# Altium PCB PCB1.PcbDoc
Units mil, origin at the board's own origin, x right, y up, seen from the top; angles counter-clockwise.
Board outline 2780 x 3330 mil, 2 copper layers (Top Layer, Bottom Layer); 17 components, 28 nets, 145 pads, 32 vias.
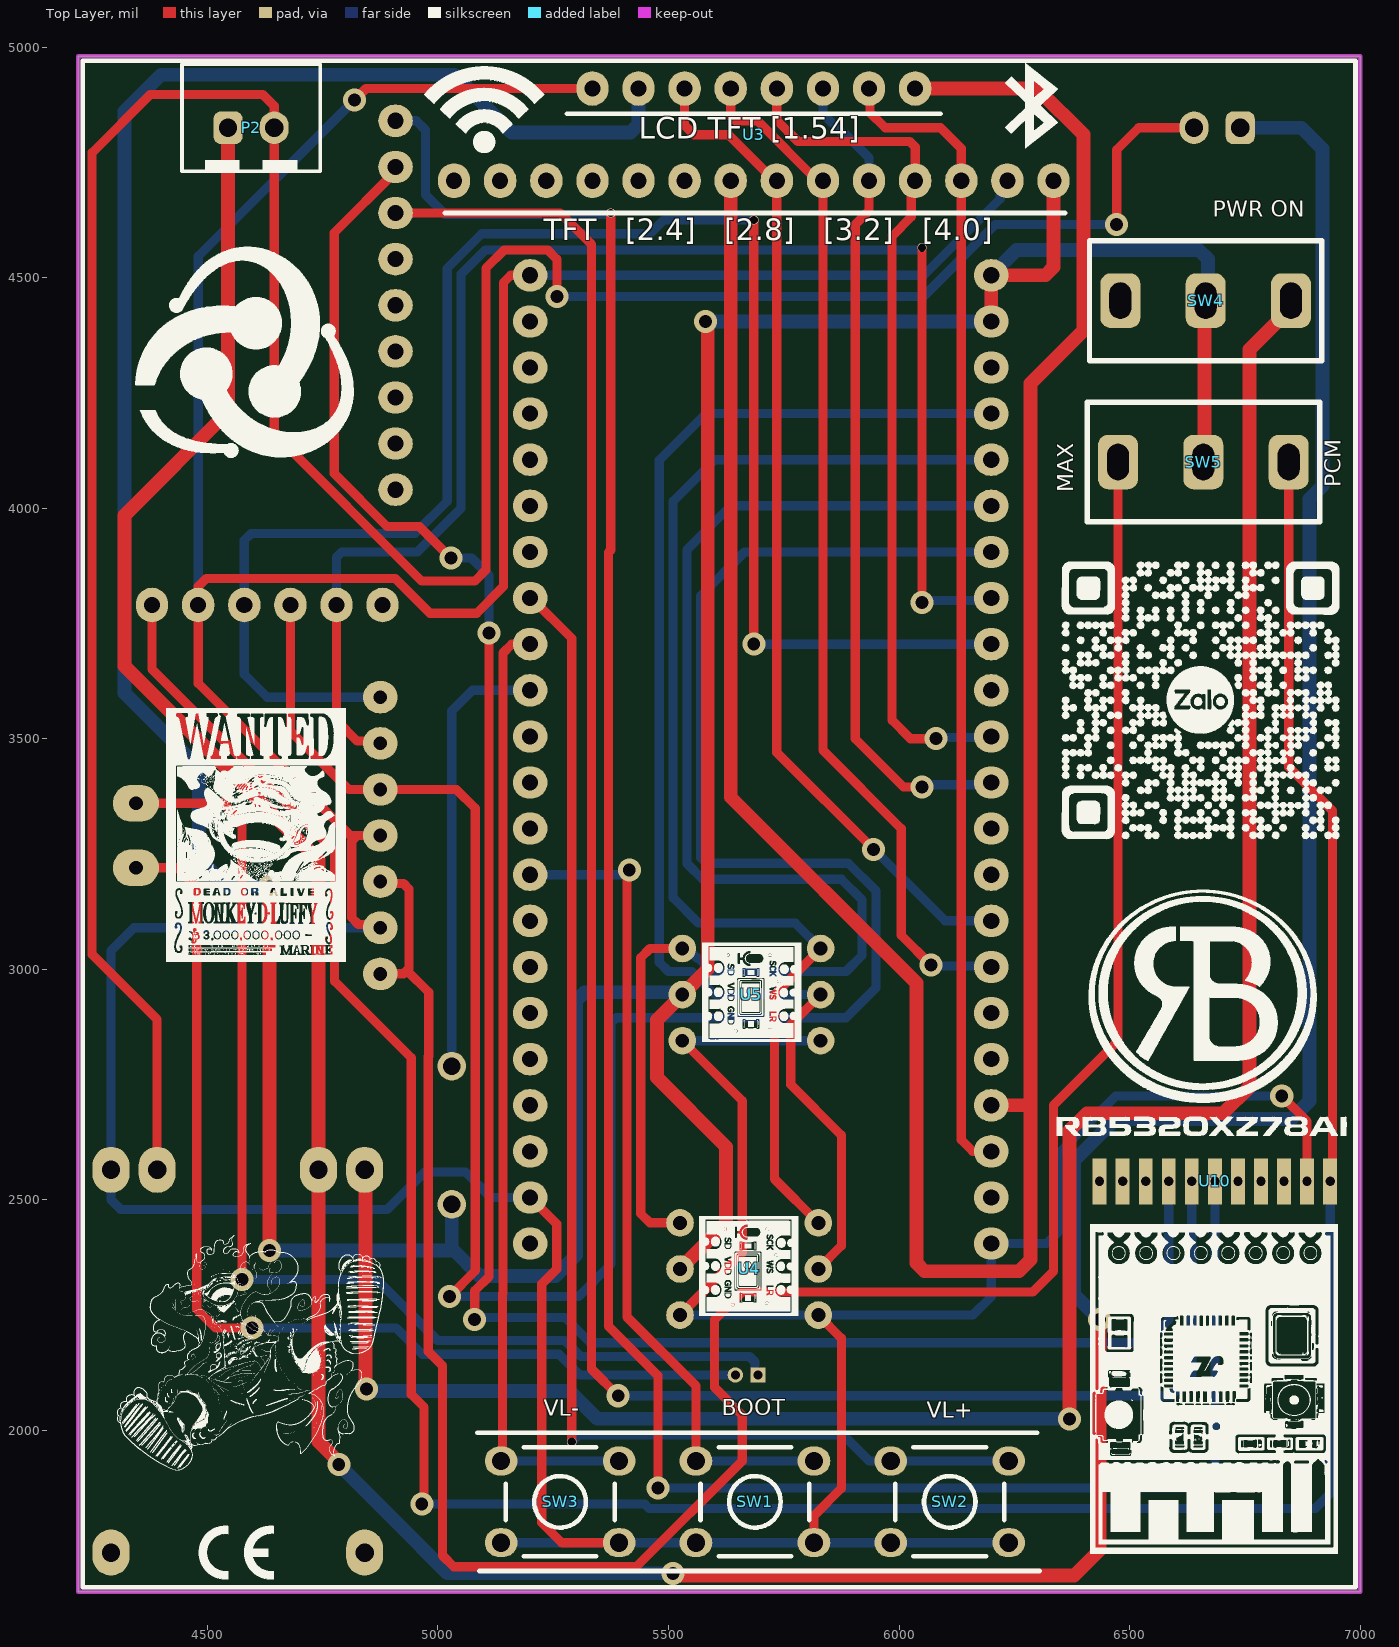
[diagram p0: Top Layer view]
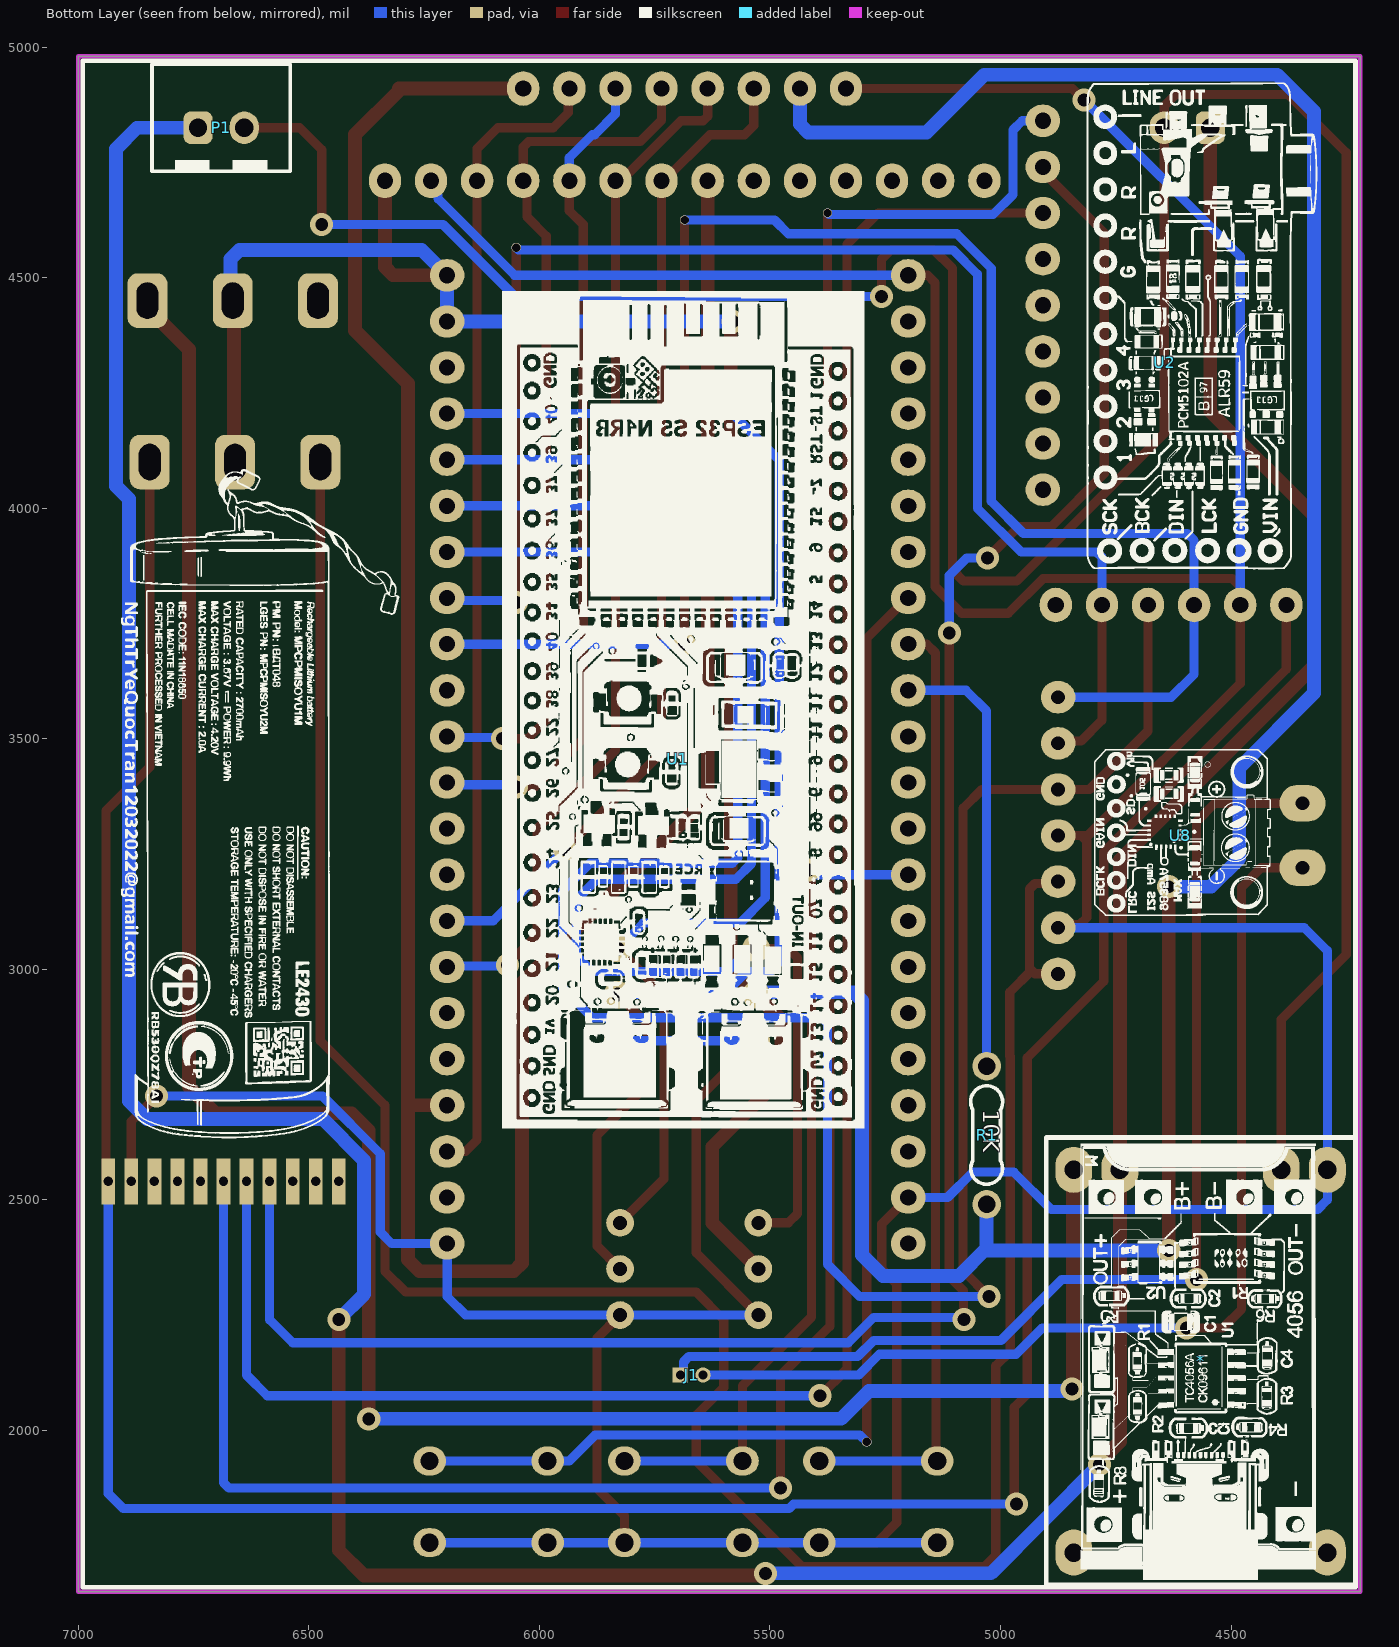
[diagram p1: Bottom Layer view, seen from below]

## Layer stack, top to bottom
Top Solder: solder mask 0.4, Solder Resist, Dk 3.5
Top Layer: signal copper 1.4
Dielectric 1: dielectric 12.6, FR-4, Dk 4.8
Bottom Layer: signal copper 1.4
Bottom Solder: solder mask 0.4, Solder Resist, Dk 3.5

## Board outline
4220,1650 4220,4980 7000,4980 7000,1650

## Design rules (kind name [scope] priority, off if disabled: settings)
Clearance [All] p1: gap=10 ignorepadtopadclearanceinfootprint=FALSE except(0: Arc-Hole Track-Hole SMDPad-Hole THPad-Hole Via-Hole Fill-Hole Poly-Hole Region-Hole Text-Hole)
PolygonConnect [All] p1: connectstyle=Relief reliefconductorwidth=10 reliefentries=4 polygonreliefangle="90 Angle" airgapwidth=10
RoutingVias [All] p1: holewidth=28 width=50 viastyle="Through Hole" minholewidth=28 minwidth=50 maxholewidth=28 maxwidth=50
SolderMaskExpansion [All] p1: expansion=4 istentingtop=FALSE
Width [All] p1: maxlimit=30 minlimit=10 preferedwidth=20
30 further rules are at their usual default settings.

## Classes and differential pairs
component class Sheet2: J1 P1 P2 R1 SW1 SW2 SW3 SW4 SW5 U1 U2 U3 U4 U5 U8 U10

## Components (designator, comment, footprint, x,y, rotation, side; value= is the part's Value field where it differs from the comment)
* "MACH_SAC_5V" TP4056 4290.99,1735 r0 bottom
J1 "53047-0210" MOLEX_53047-0210 5669.61,2120 r180 bottom
P1 "PIN" HDR/Header/2/BOX 6690,4825 r90 bottom
P2 "PIN" HDR/Header/2/BOX 4595,4825 r90 top
R1 "10K" "R 1/4W/300" 5030,2490 r90 bottom
SW1 "BOOT" SW/4/06MM 5687.5,1845 r270 top
SW2 "VL+" SW/4/06MM 6110,1845 r270 top
SW3 "VL-" SW/4/06MM 5265,1845 r270 top
SW4 "POWER" SW/3/SPDT/SS12D10 6665,4450 r0 top
SW5 "LOA_CHANGE" SW/3/SPDT/SS12D10 6660,4100 r180 top
U1 "ESP32_S3_MODULE" ESP32_S3_MODULE 6200,2405 r90 bottom
U2 "PCM5102" PCM5102 4908.03,4840 r180 bottom
U3 "TFT154" TFT 5335,4910 r0 top
U4 "MIC_IMP441" IMP441 5525,2450 r0 top
U5 "MIC_IMP441" IMP441 5530,3045 r0 top
U8 "MAX98357" MAX98357 4875,3590 r270 bottom
U10 "BLUETOOTH" BLE 6935,2540 r180 top

## Footprints (in the part's own frame and the unit in brackets; to place one, negate y for a bottom-side part, rotate by r counter-clockwise, add the part's x,y. Pads: shape width x height; smd on the part's side, far side on the other; paste and mask are expansions set on the pad)
BLE [mil]
  rect 30x100 hole 20: 0(0,0) 1(50,0) 2(100,0) 3(150,0) 4(200,0) 5(250,0) 6(300,0) 7(350,0) 8(400,0) 9(450,0) 10(500,0)
  body extent -45,-29 546,875, height 116
ESP32_S3_MODULE [mil]
  oval 70x75 hole 35: 0(0,0) 1(100,0) 2(200,0) 3(300,0) 4(400,0) 5(500,0) 6(600,0) 7(700,0) 8(800,0) 9(900,0) 10(1000,0) 11(1100,0) 12(1200,0) 13(1300,0) 14(1400,0) 15(1500,0) 16(1600,0) 17(1700,0) 18(1800,0) 19(1900,0) 20(2000,0) 21(2100,0) 23(100,-1000) 24(0,-1000) 24(200,-1000) 25(300,-1000) 26(400,-1000) 27(500,-1000) 28(600,-1000) 29(700,-1000) 30(800,-1000) 31(900,-1000) 32(1000,-1000) 33(1100,-1000) 34(1200,-1000) 35(1300,-1000) 36(1400,-1000) 37(1500,-1000) 38(1600,-1000) 39(1700,-1000) 40(1800,-1000) 41(1900,-1000) 42(2000,-1000) 43(2100,-1000)
  body extent -100,-1050 2421,50, height 426
HDR/Header/2/BOX [mm]
  rrect50% 1.8x1.6 hole 1: 1(0,1.27)
  oval 1.8x1.6 hole 1: 2(0,-1.27)
  silkscreen extent -2.41,-3.81 3.5,3.81, body extent -2.35,-3.7 3.4,3.7, height 7
IMP441 [mil]
  round 60 hole 30: 0(0,0) 1(0,-100) 2(0,-200) 3(300,0) 4(300,-100) 5(300,-200)
  body extent -122,-382 420,178, height 411
MAX98357 [mil]
  oval 70x75 hole 30: 0(0,0) 1(100,0) 2(200,0) 3(300,0) 4(400,0) 5(500,0) 6(600,0)
  oval 80x100 hole 30: 7(230,530) 8(370,530)
  body extent -54,-99 654,665, height 656
MOLEX_53047-0210 [mm]
  rect 0.85x0.85 / inner round 0.85 / far side rect 0.85x0.85 hole 0.5: 01(-0.625,0)
  round 0.85 hole 0.5: 02(0.625,0)
  body extent -2.09,-1.22 2.16,1.98, height 4.7
PCM5102 [mil]
  oval 75x70 hole 35: 0(0,0) 1(0,-100) 2(0,-200) 3(0,-300) 4(0,-400) 5(0,-500) 6(0,-600) 7(0,-700) 8(0,-800)
  oval 70x75 hole 35: 9(28,-1050) 10(128,-1050) 11(228,-1050) 12(328,-1050) 13(428,-1050) 14(528,-1050)
  body extent -66,-1112 686,140, height 529
"R 1/4W/300" [mil] "Through hole resitor, axial 300mils, 1/4W"
  round 62 hole 38: 1(0,0) 2(300,0)
  silkscreen extent 44,-35 257,35, body extent -12,-47 312,47, height 97
SW/3/SPDT/SS12D10 [mm]
  rrect50% 2.2x3 hole 1.2 slot 2 at 90 deg: 1(-4.7,0) 2(0,0) 3(4.7,0)
  silkscreen extent -6.4,-3.3 6.4,3.3, body extent -6.4,-3.3 6.35,3.8, height 12.5
SW/4/06MM [mm]
  oval 1.6x1.8 hole 1: 1(-2.25,3.25) 2(-2.25,-3.25) 3(2.25,-3.25) 4(2.25,3.25)
  silkscreen extent -3,-3 3,3, body extent -3.01,-3.87 3.02,3.87, height 5.01
TFT [mil]
  oval 70x75 hole 35: 0(0,0) 1(100,0) 2(200,0) 3(300,0) 4(400,0) 5(500,0) 6(600,0) 7(700,0) 8(1000,-200) 9(900,-200) 10(800,-200) 11(700,-200) 12(600,-200) 13(500,-200) 14(400,-200) 15(300,-200) 16(200,-200) 17(100,-200) 18(0,-200) 19(-100,-200) 20(-200,-200) 21(-300,-200)
  body extent -284,-1666 984,55, height 358
TP4056 [mil]
  oval 80x100 hole 40: 0(0,0) 1(550,0) 2(0,-830) 3(100,-830) 4(450,-830) 5(550,-830)
  silkscreen extent -60,-900 610,70, body extent -66,-1044 620,109, height 163

## Part data
J1: ".049 pitch picoblade wire to board header, vt 2 circuits", Package=None, Check_prices=https://www.snapeda.com/parts/53047-0210/Molex/view-part/?ref=eda, MF=Molex, MP=53047-0210, SnapEDA_Link=https://www.snapeda.com/parts/53047-0210/Molex/view-part/?ref=snap
P1 P2: library part "Header 2", "Header, 2-Pin"
R1: library part Resistor, "Resistor"
SW1 SW2 SW3: library part "SW SPST 4-pin", "Tact switch 4-pin"
SW4 SW5: library part "SW SPDT"

## Via types
v1: diameter 50, hole 28, Top Layer to Bottom Layer, tented both sides, 28 vias
v2: diameter 20, hole 18, Top Layer to Bottom Layer, tented both sides, 4 vias

## Nets (pads, with @x,y where several pads share a name; then routed paths per layer and width w, separated by ;. In a path a pad name is that pad's centre, name@x,y a point inside that pad or via, vN(x,y) a via of type N, cw(c..) or ccw(c..) an arc to the next point about the centre after c; other vN are vias at no path point)
3.3: R1.1 SW4.2 SW5.2 U1.20 U1.21 U3.1 U3.8 U4.1 U5.1 | length 9837.4
  Top Layer w30: v1(4635,2390) v1(4635,3179) ; U4.1 5625,2450 5625,2615 5475,2765 5475,2890 U5.1 5585,3000 5585,4394.59 5580,4399.59 v1(5580,4405) ; U1.20 U1.21 6317.43,4505 6335,4522.57 U3.8 ; SW5.2 6662.5,4102.5 6662.5,4447.5 SW4.2
  Bottom Layer w30: v1(4635,2390) 5025,2390 5030,2395 ; v1(4635,3179) 4543,3179 4482,3240 4482,3437 4320.03,3598.97 4320.03,4860.03 4400,4940 5035,4940 5160,4815 5417.43,4815 5435,4832.57 U3.1 ; R1.1 5030,2395 ; U5.1 5525,2950 5317.57,2950 5300,2932.43 5300,2380 5255,2335 5090,2335 5030,2395 ; v1(5580,4405) U1.20 U1.21 6255,4560 6650,4560 6670,4540 6670,4455 SW4.2
3.3MAX: SW5.3 U8.4 U8.6 | length 5287.4
  Top Layer w20: U8.6 4920,2990 4925.28,2990 4937,3001.72 4937,3174.14 4925.28,3185.86 4879.14,3185.86 U8.4 ; 4932.64,2997.36 4980,2950 4980,2812.12 4979,2811.12 4979,2171 5010,2140 5010,1728.64 5034.64,1704 5430.37,1704 5660,1933.63 5660,2033 5600,2093 5600,2240 5660,2300 6290,2300 6335,2345 6335,2705 6474.96,2844.96 SW5.3
3.3PCM: SW5.1 U2.14 U10.0 | length 6462.3
  Top Layer w20: U2.14 4380.03,3650.44 4775.99,3254.48 4775.99,2974.01 4942,2808 4942,2078 4970,2050 4970,1845 v1(4965,1840) ; SW5.1 6845.04,3438.49 6940,3343.53 6940,2545 U10.0
  Bottom Layer w20: v1(4965,1840) 5448.79,1840 5458.36,1830.43 6902.43,1830.43 6935,1863 U10.0
AGND: U2.1 U10.7 | length 4625.1
  Top Layer w20: U2.1 4908.03,4730 4775,4596.97 4775,4075 4890,3960 4960,3960 v1(5028,3892) ; v1(5079.2,2240.79) 5080,2241.58 5080,2302.57 5111,2333.57 v1(5111,3729)
  Bottom Layer w20: v1(5028,3892) 5073,3892 5111,3854 v1(5111,3729) ; v1(5079.2,2240.79) 5083.42,2245 5275,2245 5330,2190 6535,2190 6585,2240 U10.7
BCK: U1.14 U2.10 U8.1 | length 3238.7
  Top Layer w20: U2.10 4780.03,3539.97 4825.29,3494.71 4870.29,3494.71 U8.1 ; v1(6050,3795) v2(6050,4565)
  Bottom Layer w20: U2.10 4780.03,3893.28 4791.75,3905 4955,3905 5050,4000 5050,4507.57 5102.43,4560 6045,4560 v2(6050,4565) ; v1(6050,3795) 6055,3800 6195,3800 U1.14
BL: U1.3 U3.7 U3.15 | length 5761
  Top Layer w20: 6305,4905 6305,4910
  Top Layer w30: U3.15 5635,3373 6038,2970 6038,2362.57 6055.57,2345 6260,2345 6285,2370 6285,2705 ; U3.7 6305,4910 ; U1.3 6285,2705 ; 6305,4905 6400,4810 6400,4385 6285,4270 6285,2705
BOOT: SW1.1 SW1.2 U1.30 | length 1820.5
  Top Layer w20: v1(5415,3215) 5410,3210 5410,2246 5559.55,2096.45 SW1.2
  Bottom Layer w20: U1.30 5396.88,3205 5406.88,3215 v1(5415,3215) ; SW1.2 SW1.1
CS: U1.2 U3.6 U3.10 | length 2511
  Top Layer w20: U3.6 5937.21,4907.79 5937.21,4857.79 5970,4825 6090,4825 6135,4780 U3.10 ; U3.10@6135,4712.5 6135,2630 6160,2605 U1.2
DC: U1.10 U3.5 U3.12 | length 1809.4
  Top Layer w20: U3.12 5935,4645 5905,4615 5905,3500 6010,3395 v1(6050,3395)
  Bottom Layer w20: U3.5 5835,4855 5880,4810 5885,4810 5935,4760 U3.12 ; v1(6050,3395) 6055,3400 6195,3400 U1.10
DIN: U1.15 U2.11 U8.2 | length 5192.2
  Top Layer w20: U2.11 4680.03,3516.86 4806.89,3390 U8.2 5040,3390 5081,3349 5081,2346 v1(5025,2290)
  Bottom Layer w20: v1(5025,2290) 5305,2290 5375,2360 5375,2883.28 5386.72,2895 5885,2895 5950,2960 5950,3170 5890,3230 5581.72,3230 5570,3241.72 5570,3810 5665,3905 U1.15
GND: *.2 SW1.3 SW1.4 SW2.3 SW2.4 SW3.3 SW3.4 U1.0 U1.23 U1.43 U2.13 U3.0 U3.9 U4.2 U4.5 U5.2 U5.5 U8.3 U8.5 U10.1 | length 12907.5
  Top Layer w20: v1(4819,4885) 4844,4910 U3.0 ; U8.5 4867.79,3097.21 4827.79,3097.21 4813,3112 4813,3278 4825,3290 ; U8.3 4825,3290 ; U1.23 5257.5,2447.5 5257.5,2350 5225,2317.5 5225,1800 5268.58,1756.42 SW3.4 ; U1.43 5158,4505 5142,4489 5142,3830 5084,3772 4983,3772 4907.5,3847.5 4497.53,3847.5 4480.03,3830 U2.13 4480.03,3619.97 4810,3290 4825,3290 ; U4.2 5660,2385 5660,2715 U5.2 ; SW1.4 5815.45,1815 5875,1874.55 5875,2200 U4.5 ; v1(6830,2725) 6885,2670 U10.1
  Bottom Layer w20: U2.13 4480.03,4546.03 v1(4819,4885) ; U8.5 4340.99,3090 4290.99,3040 *.2 4290.99,2500 4311.99,2479 4890,2479 4971,2560 5060,2560 5115,2505 U1.23 ; SW3.3 SW3.4 SW1.3 SW1.4 SW2.3 SW2.4 ; U1.43 6053.64,4505 6219.61,4670.97 6219.61,4678.58 6235,4693.97 U3.9 ; U4.2 U4.5 6160,2250 6200,2290 U1.0 6320,2405 6345,2430 6345,2599.85 6470.15,2725 v1(6830,2725) ; U5.2 U5.5
LCK: U1.13 U2.12 U8.0 | length 3729.4
  Top Layer w20: v1(5685,3705) v2(5685,4625)
  Bottom Layer w20: U8.0 4630.03,3590 4580.03,3640 U2.12 4580.03,3930.03 4595,3945 4950,3945 5020,4015 5020,4520 5095,4595 5460,4595 5490,4625 v2(5685,4625) ; v1(5685,3705) U1.13
LOA+: J1.02 U8.8 | length 2291.6
  Top Layer w20: U8.8 4435,3220 4477,3178 4477,2263 4518,2222 v1(4597,2222)
  Bottom Layer w20: v1(4597,2222) 4909.34,2222 4966.34,2165 5262.57,2165 5307.57,2120 J1.02
LOA-: J1.01 U8.7 | length 2457.1
  Top Layer w20: U8.7 4535,3360 4575,3320 v1(4575,2327)
  Bottom Layer w20: v1(4575,2327) 4867,2327 4999,2195 5275,2195 5310,2160 5675.76,2160 5687.48,2148.28 5687.48,2126.73 J1.01
LROUT: U2.0 U10.5 | length 5311.6
  Top Layer w20: v2(5375,4640) 5375,3908.75 5370,3903.75 5370,2226 5477,2119 v1(5477,1875.43)
  Bottom Layer w20: U2.0 4953,4840 4973,4820 4973,4680 5016,4637 5372,4637 v2(5375,4640) ; v1(5477,1875.43) 5477.43,1875 6673.28,1875 6685,1886.72 U10.5
MIC_SCK: U1.17 U4.3 U5.3 | length 2628.6
  Top Layer w20: U4.3 5730,2545 5730,2945 U5.3
  Bottom Layer w20: U5.3 5775,3100 5565,3100 5510,3155 5510,4015 5600,4105 U1.17
MIC_SD: U1.16 U4.0 U5.0 | length 3084.7
  Top Layer w20: U4.0 5460,2450 5440,2470 5440,3025 5460,3045 U5.0
  Bottom Layer w20: U5.0 5540.82,3045 5560.82,3025 5563.14,3025 5593.14,2995 5885,2995 5920,3030 5920,3150 5875,3195 5574.29,3195 5540,3229.29 5540,3910 5635,4005 U1.16
MIC_WS: U1.18 U4.4 U5.4 | length 2918
  Top Layer w20: U4.4 5875,2400 5875,2640 5765,2750 5765,2880 U5.4
  Bottom Layer w20: U5.4 5600.71,2945 5550.71,2995 5500,2995 5480,3015 5480,4104 5581,4205 U1.18
Net*_5: *.5 SW4.3 | length 4825.3
  Top Layer w30: *.5 4843,2563 4843,2092 v1(4845,2090) ; v1(6370,2025) 6370,2650.1 6407.57,2687.68 6702.68,2687.68 6760,2745 6760,4344.21 6850.04,4434.25 SW4.3
  Bottom Layer w30: v1(4845,2090) 4848.83,2086.17 4862.97,2086.17 4863.55,2085.59 5285.41,2085.59 5346,2025 v1(6370,2025)
NetR1_2: R1.2 U1.34 | length 958.6
  Bottom Layer w20: R1.2 5030,3560 5075,3605 U1.34
ROUT: U2.2 U10.6 | length 4656.8
  Top Layer w20: U2.2 5265,4640 5333,4572 5333,2133 v1(5391,2075)
  Bottom Layer w20: v1(5391,2075) 6590,2075 6635,2120 U10.6
RST: U1.11 U3.4 U3.11 | length 1890.5
  Top Layer w20: U3.4 5735,4841 5781,4795 6023.28,4795 6035,4783.28 U3.11 6026.73,4701.73 6026.73,4631.73 5985,4590 5985,3540 6025,3500 v1(6080,3500)
  Bottom Layer w20: v1(6080,3500) 6082.5,3502.5 6197.5,3502.5 U1.11
SCL: U1.7 U3.2 U3.14 | length 2185.9
  Top Layer w20: U3.2 5535,4830 5555,4810 5630,4810 5730,4710 U3.14 5735,3470 v1(5945,3260)
  Bottom Layer w20: v1(5945,3260) 6100,3105 U1.7
SDA: U1.6 U3.3 U3.13 | length 2248.2
  Top Layer w20: U3.3 5635,4850 5645,4840 5693,4840 5823,4710 U3.13 5835,3475 6005,3305 6005,3073.71 v1(6069.36,3009.36)
  Bottom Layer w20: v1(6069.36,3009.36) 6071.53,3007.18 6197.82,3007.18 U1.6
VIN+: *.4 P1.1 P2.1 | length 8662.8
  Top Layer w30: P2.1 4545,4209 4320.03,3984.03 4320.03,3657.97 4740.99,3237.01 *.4 4740.99,1975.42 4785,1931.41 v1(4785,1926) ; v1(5510,1690) 5515,1685 6380,1685 6435,1740 v1(6435,2240)
  Bottom Layer w30: v1(4785,1926) 4905.99,1805.01 5021,1690 v1(5510,1690) ; v1(6435,2240) 6380,2295 6380,2585.36 6469.64,2675 6850.71,2675 6890,2714.29 6890,2795 6890,4019.93 6918.35,4048.27 6918.35,4779.08 6872.43,4825 P1.1
VIN-: *.3 P1.2 P2.2 | length 6576.2
  Top Layer w20: *.3 4390.99,2891.01 4250,3032 4250,4771 4376,4897 4620,4897 4645,4872 P2.2 4645,4161.81 4965.03,3841.78 5080,3841.78 5104,3865.78 5104,4520 5144,4560 5238,4560 5258,4540 v1(5258,4459) ; v1(6472,4615) 6472,4777 6520,4825 P1.2
  Bottom Layer w20: v1(5258,4459) 6052.94,4459 6208.94,4615 v1(6472,4615)
VL+: SW2.1 SW2.2 U1.36 | length 2846.3
  Top Layer w20: U1.36 5202.5,3805 5290,3717.5 v2(5290,1975)
  Bottom Layer w20: v2(5290,1975) 5305,1990 5879,1990 5935.42,1933.58 SW2.2 SW2.1
VL-: SW3.1 SW3.2 U1.35 | length 2076.8
  Top Layer w20: SW3.2 5140,1936.53 5140,2296.95 5141,2297.95 5141,3686 5160,3705 U1.35
  Bottom Layer w20: SW3.2 SW3.1
pads on no net: *.0 *.1 SW4.1 U1.1 U1.4 U1.5 U1.8 U1.9 U1.12 U1.19 U1.24 U1.25 U1.26 U1.27 U1.28 U1.29 U1.31 U1.32 U1.33 U1.37 U1.38 U1.39 U1.40 U1.41 U1.42 U2.3 U2.4 U2.5 U2.6 U2.7 U2.8 U2.9 U3.16 U3.17 U3.18 U3.19 U3.20 U3.21 U10.2 U10.3 U10.4 U10.8 U10.9 U10.10

## Keep-outs
Keep-Out Layer:
  lines w10: 4220,1650 4220,4980 7000,4980 7000,4875 7000,1650 4220,1650

## Silkscreen, mask and mechanical layers (free items; w line width, h text height)
Top Overlay:
  drawing of 1646 lines, arcs and shapes, not listed
  text "LCD TFT [1.54]" at 5435,4784.43 h80
  text "PWR ON" at 6680,4620.07 h60
  text "TFT   [2.4]   [2.8]   [3.2]   [4.0]" at 5230,4564.43 h80
  text "PCM" at 6969.97,4045 h60 r90
  text "MAX" at 6390,4035 h60 r90
  text "BOOT" at 5615,2020.71 h60
  text "VL-" at 5230,2020 h60
  text "VL+" at 6060,2015 h60
Bottom Overlay:
  drawing of 1165 lines, arcs and shapes, not listed
  text "10K" at 5049.29,2695 h60 r90